# Altium PCB PCI Express Mini L1.PCBDOC (part 5 of 7)
Units mm, origin at the board's own origin, x right, y up, seen from the top; angles counter-clockwise.
Board outline 70 x 83.2 mm, 6 copper layers (TopLayer, Layer 1, Layer 2, Layer 3, Layer 4, Bottom Layer), stack 0.914 mm thick; 402 components, 242 nets, 1301 pads, 522 vias.
Unrouted connection lines stored in the file: 225.
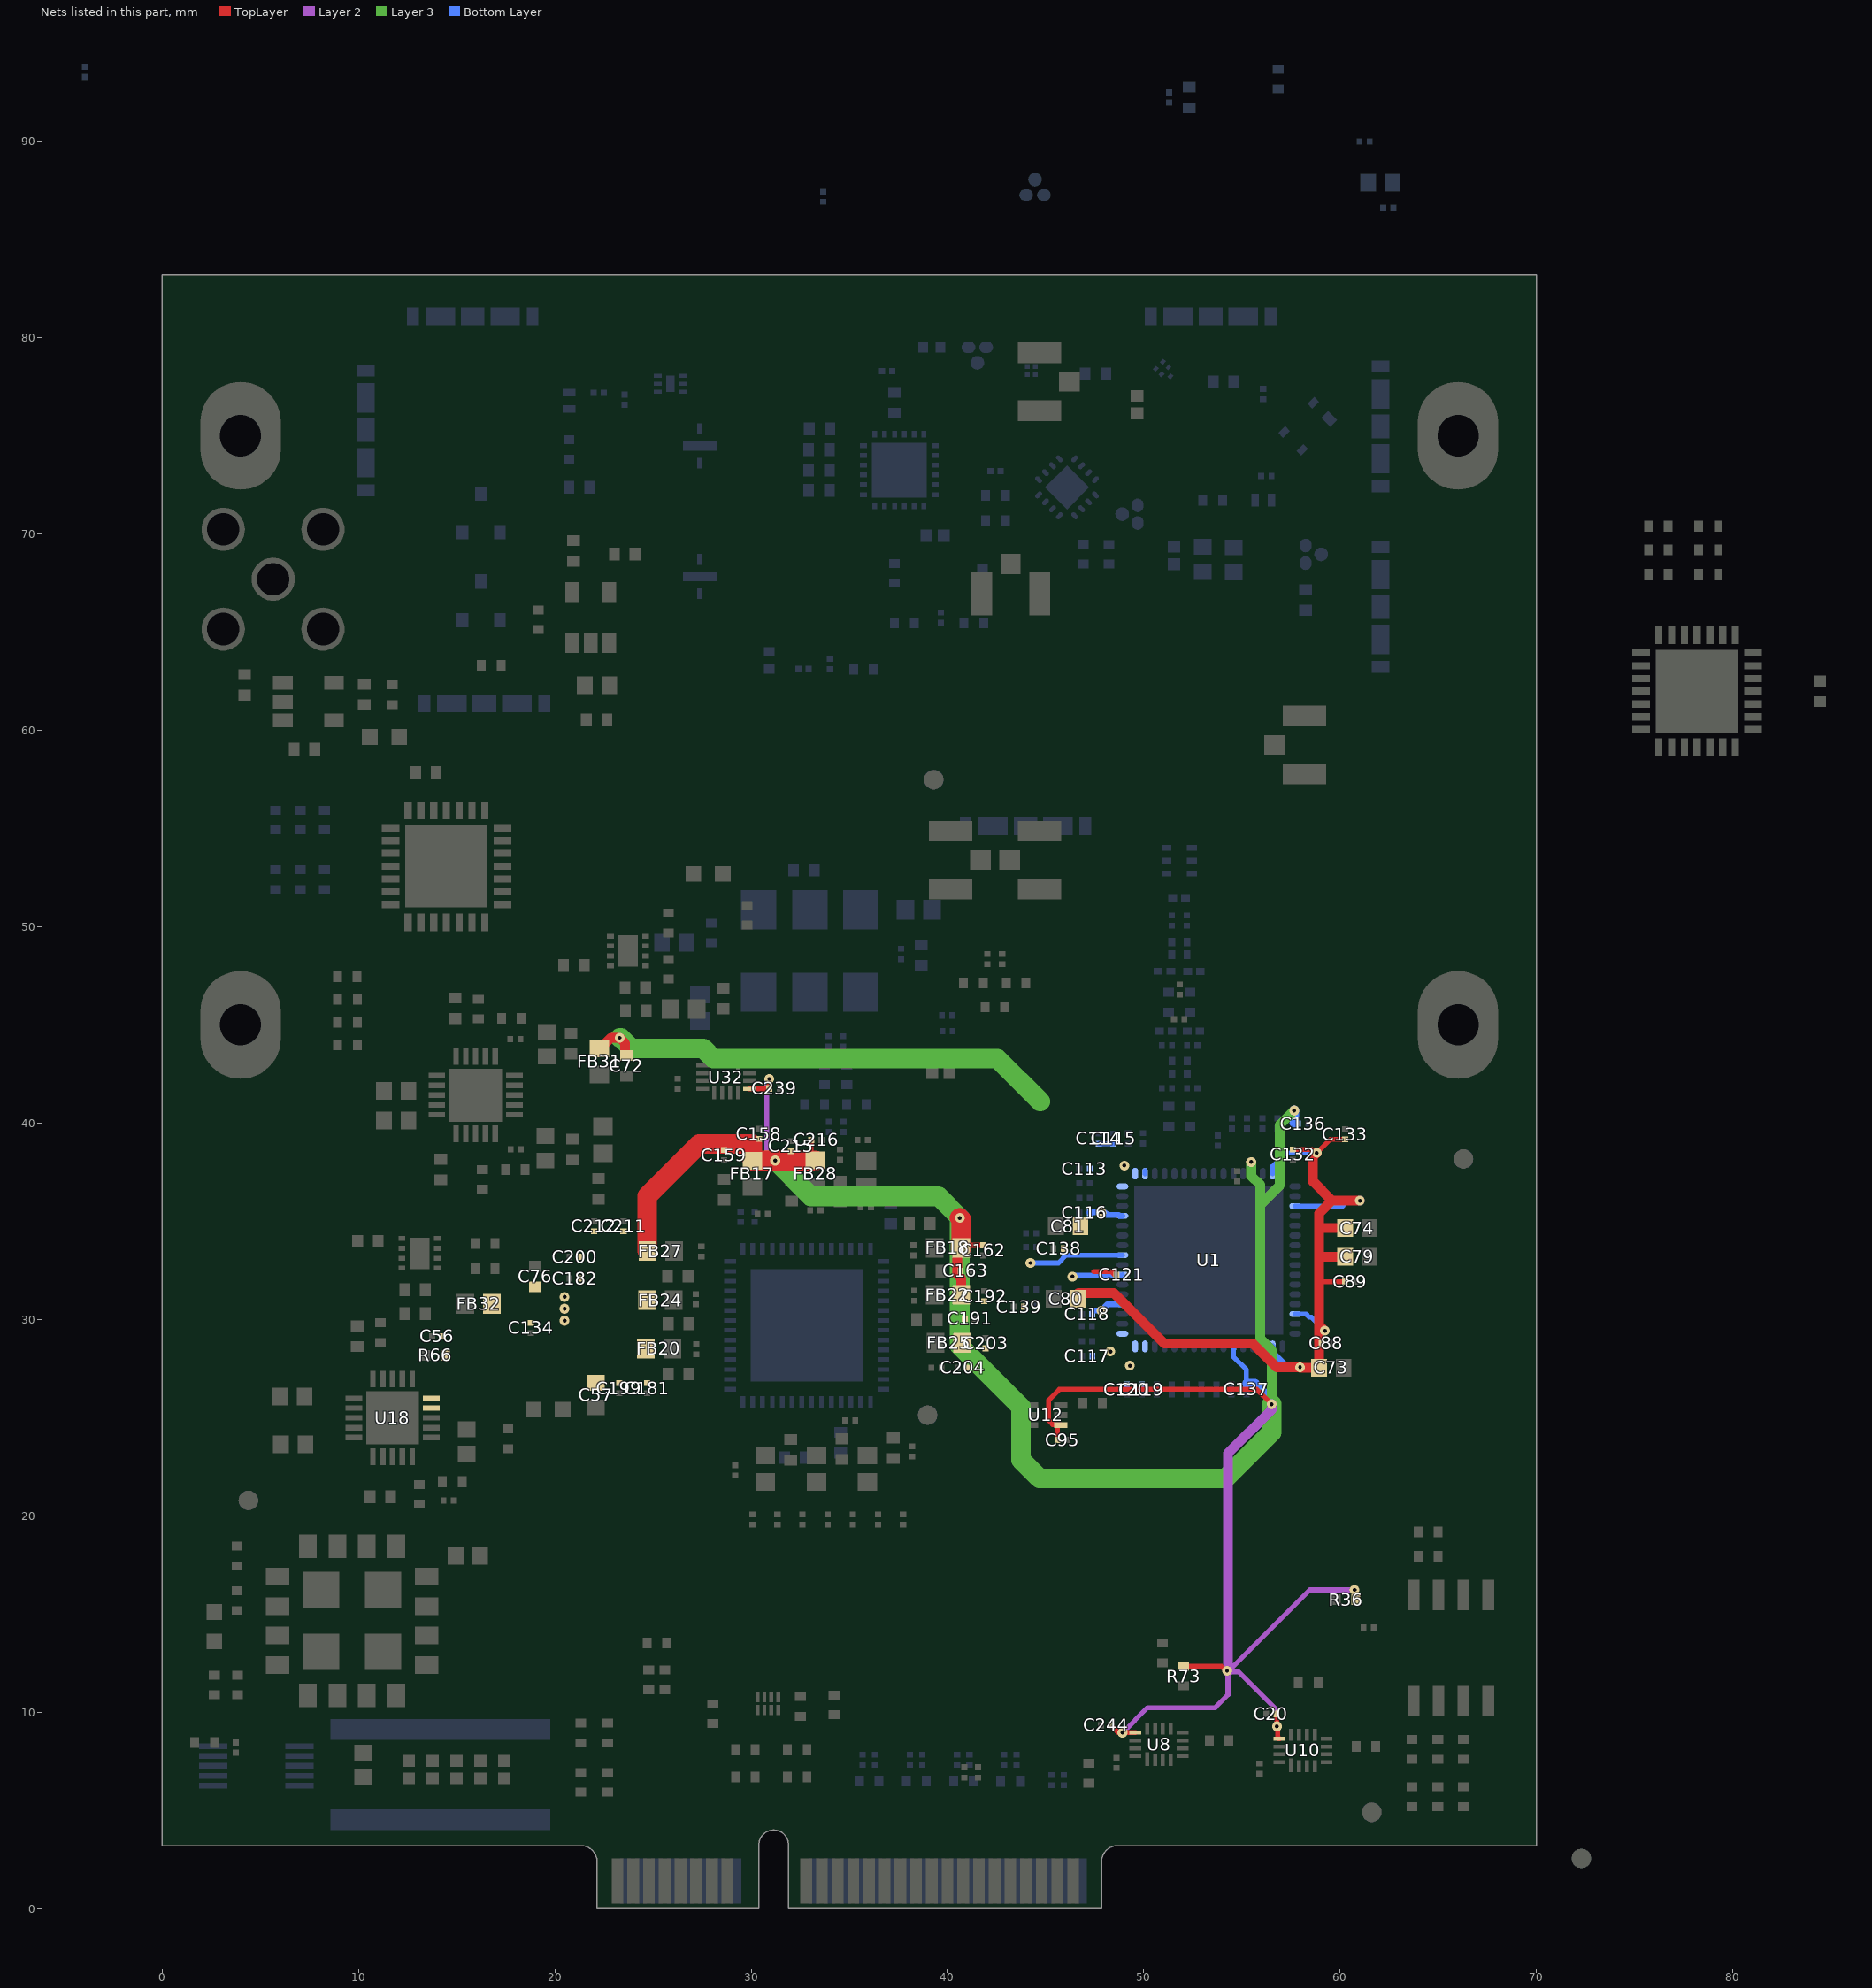
[diagram p6: the nets of this part, all layers, seen from the top]

## Part data (continued)
U3: "IC MONITOR PWR/CURR BIDIR 10MSOP", Case/Package=VSSOP, Input Bias Current=10uA, Input Offset Voltage (Vos)=2.5uV, Manufacturer="Texas Instruments", Max Operating Temperature=125°C, Max Supply Voltage=5.5V, Min Operating Temperature=-40°C, Min Supply Voltage=2.7V, Nominal Supply Current=330uA, Output Current=10mA, Package Quantity=1, Supplier Part Number 1=296-29034-1-ND, Accuracy=0.02%, Common Mode Rejection Ratio=140dB, ComponentLink1Description=https://datasheet.ciiva.com/1939/ina226-1939633.pdf?src-supplier=Digi-Key, ComponentLink1URL=https://datasheet.ciiva.com/1939/ina226-1939633.pdf?src-supplier=Digi-Key, ComponentLink2Description=https://datasheet.ciiva.com/4875/sbos547-126280-4875559.pdf?src-supplier=Mouser, ComponentLink2URL=https://datasheet.ciiva.com/4875/sbos547-126280-4875559.pdf?src-supplier=Mouser, ComponentLink3Description=https://datasheet.ciiva.com/1939/ina226-1939634.pdf?src-supplier=Digi-Key, ComponentLink3URL=https://datasheet.ciiva.com/1939/ina226-1939634.pdf?src-supplier=Digi-Key, ComponentLink4Description=https://datasheet.ciiva.com/1939/ina226-1939635.pdf?src-supplier=Digi-Key, ComponentLink4URL=https://datasheet.ciiva.com/1939/ina226-1939635.pdf?src-supplier=Digi-Key, ComponentLink5Description=https://datasheet.ciiva.com/14196/ina226-14196741.pdf?src-supplier=Avnet, ComponentLink5URL=https://datasheet.ciiva.com/14196/ina226-14196741.pdf?src-supplier=Avnet, ComponentLink6Description=https://datasheet.ciiva.com/22693/1840205-22693516.pdf?src-supplier=Element14, ComponentLink6URL=https://datasheet.ciiva.com/22693/1840205-22693516.pdf?src-supplier=Element14, Contact Plating=Gold, Lead Free="Lead Free", Manufacturer Part Number=INA226AIDGSR, Mount="Surface Mount", Number of Pins=10, Packaging="Tape and Reel", Pricing 1="1 = 2,88000, 10 = 2,58900, 100 = 2,12100, 500 = 1,80554, 1000 = 1,52275 (USD)", Radiation Hardening=No, REACH SVHC="No SVHC", RoHS=Yes, Stock 1=62024, Supplier 1=Digi-Key
U4 U33: "IC I/O EXPANDER I2C 16B 28QFN", Case/Package=QFN, Frequency=1.7MHz, Manufacturer=Microchip, Max Operating Temperature=125°C, Min Operating Temperature=-40°C, Operating Supply Voltage=5.5V, Output Current=25mA, Package Quantity=1600, Power Dissipation=700mW, Supplier Part Number 1=MCP23017T-E/MLCT-ND, ComponentLink1Description=https://datasheet.ciiva.com/1780/21952b-1780757.pdf?src-supplier=Digi-Key, ComponentLink1URL=https://datasheet.ciiva.com/1780/21952b-1780757.pdf?src-supplier=Digi-Key, ComponentLink2Description=https://datasheet.ciiva.com/16454/filehandler-aspxddocname-en023709-16454263.pdf?src-supplier=Future+Electronics, ComponentLink2URL=https://datasheet.ciiva.com/16454/filehandler-aspxddocname-en023709-16454263.pdf?src-supplier=Future+Electronics, ComponentLink3Description=https://datasheet.ciiva.com/8128/21952b-8128584.pdf?src-supplier=Avnet, ComponentLink3URL=https://datasheet.ciiva.com/8128/21952b-8128584.pdf?src-supplier=Avnet, Contact Plating=Tin,Matte, Interface=I2C,Serial, Lead Free="Lead Free", Manufacturer Part Number=MCP23017T-E/ML, Max Frequency=1.7MHz, Number of Bits=16, Number of I/Os=16, Packaging="Tape and Reel", Pricing 1="1 = 1,45000, 25 = 1,21560, 100 = 1,10210 (USD)", RoHS=Yes, Stock 1=7016, Supplier 1=Digi-Key
U5 U20: "IC REG LINEAR 5V 300MA SOT23-5", Case/Package=SOT-23-5, Dropout Voltage=250mV, Manufacturer=Diodes, Max Input Voltage=13.2V, Max Operating Temperature=125°C, Max Output Current=300mA, Min Input Voltage=2.5V, Min Operating Temperature=-40°C, Output Voltage=5V, Package Quantity=3000, Power Supply Rejection Ratio (PSRR)=75dB, Quiescent Current=150uA, Supplier Part Number 1=AP2210K-5.0TRG1DICT-ND, Accuracy=1%, Category="Voltage Regulators - Linear", ComponentLink1Description=https://datasheet.ciiva.com/29569/ap2210-29569974.pdf?src-supplier=Digi-Key, ComponentLink1URL=https://datasheet.ciiva.com/29569/ap2210-29569974.pdf?src-supplier=Digi-Key, ComponentLink2Description=https://datasheet.ciiva.com/29569/ap2210-29569975.pdf?src-supplier=Digi-Key, ComponentLink2URL=https://datasheet.ciiva.com/29569/ap2210-29569975.pdf?src-supplier=Digi-Key, ComponentLink3Description=https://datasheet.ciiva.com/29569/ap2210-29569976.pdf?src-supplier=Digi-Key, ComponentLink3URL=https://datasheet.ciiva.com/29569/ap2210-29569976.pdf?src-supplier=Digi-Key, Lead Free="Lead Free", Manufacturer Part Number=AP2210K-5.0TRG1, Mount="Surface Mount", Number of Outputs=1, Number of Pins=5, Number of Regulators=1, Output Current=300mA, Output Type=Fixed, Packaging="Tape and Reel", Polarity=Positive, Pricing 1="1=0,42000, 10=0,34200, 25=0,31280, 100=0,21090, 250=0,17452, 500=0,15998, 1000=0,11999 (USD)", RoHS=Yes, Stock 1=36767, Supplier 1=Digi-Key, Weight=0.001058oz
U6: "Microchip 24LC32AT-I/SN Serial EEPROM Memory, 32kbit, 1000ns, 2.5  5.5 V 8-Pin SOIC", Case/Package=SOIC, Frequency=400kHz, Manufacturer=Microchip, Max Operating Temperature=85°C, Max Supply Voltage=5.5V, Min Operating Temperature=-40°C, Min Supply Voltage=2.5V, Nominal Supply Current=3mA, Package Quantity=3300, Supplier Part Number 1=24LC32AT-I/SNCT-ND, Access Time=900ns, Category=EEPROM, ComponentLink1Description=https://datasheet.ciiva.com/1165/1669362-1165104.pdf?src-supplier=Newark, ComponentLink1URL=https://datasheet.ciiva.com/1165/1669362-1165104.pdf?src-supplier=Newark, ComponentLink2Description=https://datasheet.ciiva.com/15123/getdatasheetpartid-768552-15123863.pdf?src-supplier=Verical, ComponentLink2URL=https://datasheet.ciiva.com/15123/getdatasheetpartid-768552-15123863.pdf?src-supplier=Verical, ComponentLink3Description=https://datasheet.ciiva.com/14134/24aa32a-24lc32a-eng-tds-14134838.pdf?src-supplier=Distrelec, ComponentLink3URL=https://datasheet.ciiva.com/14134/24aa32a-24lc32a-eng-tds-14134838.pdf?src-supplier=Distrelec, ComponentLink4Description=https://datasheet.ciiva.com/8059/1669362-8059144.pdf?src-supplier=Element14, ComponentLink4URL=https://datasheet.ciiva.com/8059/1669362-8059144.pdf?src-supplier=Element14, ComponentLink5Description=https://datasheet.ciiva.com/3184/21713l-3184953.pdf?src-supplier=Avnet, ComponentLink5URL=https://datasheet.ciiva.com/3184/21713l-3184953.pdf?src-supplier=Avnet, ComponentLink6Description=https://datasheet.ciiva.com/17651/21713l-17651374.pdf?src-supplier=Avnet+Europe, ComponentLink6URL=https://datasheet.ciiva.com/17651/21713l-17651374.pdf?src-supplier=Avnet+Europe, Contact Plating=Tin,Matte, Density=32Kb, Height=1.5mm, Interface=I2C,Serial,2-Wire, Lead Free="Lead Free", Length=4.9mm, Manufacturer Part Number=24LC32AT-I/SN, Max Frequency=400kHz, Memory Size=32Kb, Memory Type=EEPROM, Mount="Surface Mount", Number of Pins=8, Number of Words=4, Packaging="Tape and Reel", Pricing 1="1=0,34000, 25=0,33000, 100=0,31000 (USD)", Radiation Hardening=No, REACH SVHC="No SVHC", RoHS=Yes, Stock 1=9460, Supplier 1=Digi-Key, Width=3.9mm
U7 U18: "IC REG LINEAR POS ADJ 1A 20QFN", Case/Package=QFN, Dropout Voltage=130mV, Manufacturer="Texas Instruments", Max Operating Temperature=125°C, Min Current Limit=1.5A, Min Operating Temperature=-40°C, Output Current=1A, Output Voltage=5V, Quiescent Current=2mA, Supplier Part Number 1=296-43312-1-ND, Category="Voltage References", ComponentLink1Description=http://www.ti.com/lit/gpn/tps7a88?src-supplier=Mouser, ComponentLink1URL=http://www.ti.com/lit/gpn/tps7a88?src-supplier=Mouser, ComponentLink2Description=http://www.ti.com/lit/ds/symlink/tps7a88.pdf?src-supplier=Digi-Key, ComponentLink2URL=http://www.ti.com/lit/ds/symlink/tps7a88.pdf?src-supplier=Digi-Key, ComponentLink3Description=http://www.ti.com/general/docs/lit/getliterature.tsp?genericPartNumber=TPS7A88&amp;&amp;fileType=pdf&src-supplier=Farnell, ComponentLink3URL=http://www.ti.com/general/docs/lit/getliterature.tsp?genericPartNumber=TPS7A88&amp;&amp;fileType=pdf&src-supplier=Farnell, Lead Free="Lead Free", Manufacturer Part Number=TPS7A8801RTJT, Mount="Surface Mount", Number of Outputs=2, Number of Pins=20, Number of Regulators=2, Packaging="Tape and Reel", Pricing 1="1=2,77000, 10=2,48700, 25=2,34600, 100=1,87670 (USD)", RoHS=Yes, Stock 1=1455, Supplier 1=Digi-Key
U8 U10: "4-bit dual-supply bus transceiver with 3-state outputs and independent direction control inputs 16-UQFN -40 to 125", Manufacturer="Texas Instruments", Supplier Part Number 1=296-SN74AXC4T774RSVRCT-ND, Category="Buffers, Drivers and Transceivers", Manufacturer Part Number=SN74AXC4T774RSVR, Pricing 1="1=1,21000, 10=1,08600, 25=1,03040, 100=0,84640, 250=0,79120, 500=0,69920, 1000=0,55200 (USD)", RoHS=No, Stock 1=2179, Supplier 1=Digi-Key
U9: Manufacturer="Texas Instruments", Max Operating Temperature=85°C, Min Operating Temperature=-40°C, Supplier Part Number 1=296-51339-1-ND, Manufacturer Part Number=LMK04610RTQR, Number of Inputs=2, Number of Outputs=10, Pricing 1="1 = 20,47000, 10 = 18,87700, 100 = 16,11940, 500 = 14,63474 (USD)", RoHS=No, Stock 1=2022, Supplier 1=Digi-Key
U11: "BALUN WIMAX1600MHZ", Case Code (Imperial)=0805, Case Code (Metric)=2012, Frequency=1.6GHz, Manufacturer=Johanson, Manufacturer Part Number=1720BL15A0100_WM, Max Operating Temperature=85°C, Min Operating Temperature=-40°C, Package Quantity=4000, Case/Package=0805, Category=Uncategorized, ComponentLink1Description=https://datasheet.ciiva.com/24023/balun-1600bl15b100-v2-242372-24023192.pdf?src-supplier=Mouser, ComponentLink1URL=https://datasheet.ciiva.com/24023/balun-1600bl15b100-v2-242372-24023192.pdf?src-supplier=Mouser, ComponentLink2Description=https://datasheet.ciiva.com/3859/balun-1600bl15b100-v2-3859272.pdf?src-supplier=Arrow+Electronics, ComponentLink2URL=https://datasheet.ciiva.com/3859/balun-1600bl15b100-v2-3859272.pdf?src-supplier=Arrow+Electronics, ComponentLink3Description=https://datasheet.ciiva.com/2788/1600bl15b100-2788754.pdf?src-supplier=Digi-Key, ComponentLink3URL=https://datasheet.ciiva.com/2788/1600bl15b100-2788754.pdf?src-supplier=Digi-Key, ComponentLink4Description=https://datasheet.ciiva.com/2788/1600bl15b100-2788755.pdf?src-supplier=Digi-Key, ComponentLink4URL=https://datasheet.ciiva.com/2788/1600bl15b100-2788755.pdf?src-supplier=Digi-Key, ComponentLink5Description=https://datasheet.ciiva.com/2788/1600bl15b100-2788756.pdf?src-supplier=Digi-Key, ComponentLink5URL=https://datasheet.ciiva.com/2788/1600bl15b100-2788756.pdf?src-supplier=Digi-Key, Composition=Ceramic, Impedance=100R, Insertion Loss=1dB, Mount="Surface Mount", Packaging="Tape and Reel", Pricing 1="1=0,83000, 10=0,80900, 25=0,54120, 50=0,48180, 100=0,44140, 250=0,39600, 500=0,38776, 1000=0,28050 (USD)", Radiation Hardening=No, RoHS=Yes, Stock 1=406, Termination=SMD/SMT
U12: "TXB0101 (LVC1T55) DRLT Setup", Case/Package=SOT-553-6, High Level Output Current=-20uA, Low Level Output Current=20uA, Manufacturer="Texas Instruments", Max Operating Temperature=85°C, Max Supply Voltage=5.5V, Min Operating Temperature=-40°C, Min Supply Voltage=1.65V, Package Quantity=1, Supplier Part Number 1=296-32600-1-ND, Category="Integrated Circuits (ICs)", ComponentLink1Description=https://datasheet.ciiva.com/15096/getdatasheetpartid-539440-15096428.pdf?src-supplier=Verical, ComponentLink1URL=https://datasheet.ciiva.com/15096/getdatasheetpartid-539440-15096428.pdf?src-supplier=Verical, ComponentLink2Description=https://datasheet.ciiva.com/6615/txb0101-6615081.pdf?src-supplier=Digi-Key, ComponentLink2URL=https://datasheet.ciiva.com/6615/txb0101-6615081.pdf?src-supplier=Digi-Key, ComponentLink3Description=https://datasheet.ciiva.com/6615/txb0101-6615083.pdf?src-supplier=Digi-Key, ComponentLink3URL=https://datasheet.ciiva.com/6615/txb0101-6615083.pdf?src-supplier=Digi-Key, ComponentLink4Description=https://datasheet.ciiva.com/6615/txb0101-6615084.pdf?src-supplier=Digi-Key, ComponentLink4URL=https://datasheet.ciiva.com/6615/txb0101-6615084.pdf?src-supplier=Digi-Key, Contact Plating=Gold, Data Rate=100Mbps, Height=0.55mm, Lead Free="Lead Free", Length=1.7mm, Logic Function=Translator, Manufacturer Part Number=TXB0101DRLT, Mount="Surface Mount", Number of Bits=1, Number of Channels=1, Number of Pins=6, Packaging="Tape and Reel", Pricing 1="1=0,56000, 10=0,49500, 25=0,46520, 100=0,37950 (USD)", Propagation Delay=4ns, Radiation Hardening=No, RoHS=Yes, Stock 1=1962, Supplier 1=Digi-Key, Turn-On Delay Time=31ns, Weight=9.9E-05oz, Width=1.3mm
U13: Operating Frequency="1550 - 1615 MHz", Supplier Part Number 1=BGA524N6E6327XTSA1DKR-ND, Gain="16,6 dBm", Part Number=BGA524N6, Supplier 1=Digi-Key, URL=https://www.infineon.com/dgdl/Infineon-BGA524N6-DS-v03_00-en.pdf?fileId=db3a304344e406b50144e44dfad302b9
U14: Frequency="DC - 3.5GHz", Supplier Part Number 1=BGA616H6327XTSA1CT-ND, Supplier 1=Digi-Key
U15: "RF Detector 0MHz to 6000MHz 16-Pin LFCSP EP T/R", Manufacturer="Analog Devices", Operating Supply Current=4mA, Supplier Part Number 1=ADL5910ACPZN-R7CT-ND, Category="RF Semiconductors and Devices", ComponentLink1Description=https://www.analog.com/media/en/technical-documentation/data-sheets/ADL5910.pdf?src-supplier=Digi-Key, ComponentLink1URL=https://www.analog.com/media/en/technical-documentation/data-sheets/ADL5910.pdf?src-supplier=Digi-Key, Manufacturer Part Number=ADL5910ACPZN-R7, Number of Pins=16, Packaging="Cut Tape", Pricing 1="1=5,17000, 10=4,64100, 25=4,38760, 100=3,80250, 250=3,60752, 500=3,23700 (USD)", RoHS=No, Stock 1=1503, Supplier 1=Digi-Key
U16: "TEXAS INSTRUMENTS   PCA9306DQER.   IC, SMBus, 5V, X2SON-8", Low Level Output Current=128mA, Manufacturer 1="Texas Instruments", Max Operating Temperature=85°C, Max Supply Voltage=5V, Min Operating Temperature=-40°C, Min Supply Voltage=0uV, Package Quantity=1, Supplier Part Number 1=296-27957-1-ND, ComponentLink1Description=https://datasheet.ciiva.com/22631/1719693-22631024.pdf?src-supplier=Element14, ComponentLink1URL=https://datasheet.ciiva.com/22631/1719693-22631024.pdf?src-supplier=Element14, ComponentLink2Description=https://datasheet.ciiva.com/1899/pca9306-1899328.pdf?src-supplier=Digi-Key, ComponentLink2URL=https://datasheet.ciiva.com/1899/pca9306-1899328.pdf?src-supplier=Digi-Key, ComponentLink3Description=https://datasheet.ciiva.com/15095/getdatasheetpartid-306496-15095555.pdf?src-supplier=Verical, ComponentLink3URL=https://datasheet.ciiva.com/15095/getdatasheetpartid-306496-15095555.pdf?src-supplier=Verical, ComponentLink4Description=https://datasheet.ciiva.com/1504/1862428-1504149.pdf?src-supplier=Element14, ComponentLink4URL=https://datasheet.ciiva.com/1504/1862428-1504149.pdf?src-supplier=Element14, ComponentLink5Description=https://datasheet.ciiva.com/1899/pca9306-1899326.pdf?src-supplier=Digi-Key, ComponentLink5URL=https://datasheet.ciiva.com/1899/pca9306-1899326.pdf?src-supplier=Digi-Key, ComponentLink6Description=https://datasheet.ciiva.com/14287/pca9306-14287374.pdf?src-supplier=Avnet, ComponentLink6URL=https://datasheet.ciiva.com/14287/pca9306-14287374.pdf?src-supplier=Avnet, ComponentLink7Description=https://datasheet.ciiva.com/14287/pca9306-14287470.pdf?src-supplier=Avnet, ComponentLink7URL=https://datasheet.ciiva.com/14287/pca9306-14287470.pdf?src-supplier=Avnet, ComponentLink8Description=https://datasheet.ciiva.com/1899/pca9306-1899327.pdf?src-supplier=Digi-Key, ComponentLink8URL=https://datasheet.ciiva.com/1899/pca9306-1899327.pdf?src-supplier=Digi-Key, ComponentLink9Description=https://datasheet.ciiva.com/26041/pca9306-26041014.pdf?src-supplier=Avnet+Europe, ComponentLink9URL=https://datasheet.ciiva.com/26041/pca9306-26041014.pdf?src-supplier=Avnet+Europe, Height=0.35mm, Lead Free="Lead Free", Length=1.45mm, Logic Function=Translator, Manufacturer Part Number 1=PCA9306DQER, Number of Bits=2, Number of Channels=2, Number of Outputs=2, Number of Pins=8, Output Type=I2C, Packaging="Tape and Reel", Pricing 1="1=0,67000, 10=0,59100, 100=0,45340, 500=0,35844, 1000=0,28675 (USD)", Propagation Delay=0.3ns, Radiation Hardening=No, REACH SVHC="No SVHC", RoHS=Yes, Stock 1=25002, Supplier 1=Digi-Key, Turn-On Delay Time=1.4ns, Width=1.05mm
U17: library part 171031801, "MagI3C-VDRM Variable Step Down Regulator Module, LGA-16EP, 4-18Vin, 3Aout", Input Voltage=4-18V, Manufacturer="Wurth Elektronik", Operating Temperature="-40 to +125degC", Output Current=3A, Output Voltage=0.8-17V, ComponentLink1Description=Manufacturer, ComponentLink1URL=http://www.we-online.de, ComponentLink2Description=Datasheet, ComponentLink2URL=https://katalog.we-online.de/pm/datasheet/171031801.pdf, Manufacturer Part Number=171031801, Mounting Technology=SMT, Packaging="Tape and Reel", Published Date="April 2020", Size=LGA-16EP
U19 U21: "IC REG LIN POS ADJ 500MA 8LFCSP", Case/Package=MSOP, Dropout Voltage=130mV, Manufacturer="Analog Devices", Max Input Voltage=5.5V, Max Operating Temperature=125°C, Max Output Current=500mA, Max Output Voltage=5V, Max Supply Current=210uA, Min Current Limit=550mA, Min Input Voltage=2.3V, Min Operating Temperature=-40°C, Min Output Voltage=800mV, Nominal Supply Current=45uA, Power Supply Rejection Ratio (PSRR)=60dB, Reference Voltage=500mV, Supplier Part Number 1=2457144, Accuracy=1%, ComponentLink1Description=https://datasheet.ciiva.com/17365/adp124-125-17365589.pdf?src-supplier=Avnet+Europe, ComponentLink1URL=https://datasheet.ciiva.com/17365/adp124-125-17365589.pdf?src-supplier=Avnet+Europe, ComponentLink2Description=https://datasheet.ciiva.com/2056/adp124-125-2056955.pdf?src-supplier=Digi-Key, ComponentLink2URL=https://datasheet.ciiva.com/2056/adp124-125-2056955.pdf?src-supplier=Digi-Key, ComponentLink3Description=https://datasheet.ciiva.com/2056/adp124-125-2056954.pdf?src-supplier=Digi-Key, ComponentLink3URL=https://datasheet.ciiva.com/2056/adp124-125-2056954.pdf?src-supplier=Digi-Key, ComponentLink4Description=https://datasheet.ciiva.com/2056/adp124-125-2056956.pdf?src-supplier=Digi-Key, ComponentLink4URL=https://datasheet.ciiva.com/2056/adp124-125-2056956.pdf?src-supplier=Digi-Key, ComponentLink5Description=https://datasheet.ciiva.com/48694/001251247-da-01-en-ic-reg-l-adj-adp125acpz-r7-lfcspud-8-adi-48694599.pdf?src-supplier=Conrad, ComponentLink5URL=https://datasheet.ciiva.com/48694/001251247-da-01-en-ic-reg-l-adj-adp125acpz-r7-lfcspud-8-adi-48694599.pdf?src-supplier=Conrad, ComponentLink6Description=http://datasheet.octopart.com/ADP125ACPZ-R7-Analog-Devices-datasheet-11525030.pdf?src-supplier=Newark, ComponentLink6URL=http://datasheet.octopart.com/ADP125ACPZ-R7-Analog-Devices-datasheet-11525030.pdf?src-supplier=Newark, ComponentLink7Description=http://datasheet.octopart.com/ADP125ACPZ-R7-Analog-Devices-datasheet-38878834.pdf?src-supplier=Newark, ComponentLink7URL=http://datasheet.octopart.com/ADP125ACPZ-R7-Analog-Devices-datasheet-38878834.pdf?src-supplier=Newark, ComponentLink8Description=http://datasheet.octopart.com/ADP125ACPZ-R7-Analog-Devices-datasheet-10623001.pdf?src-supplier=Analog+Devices, ComponentLink8URL=http://datasheet.octopart.com/ADP125ACPZ-R7-Analog-Devices-datasheet-10623001.pdf?src-supplier=Analog+Devices, ComponentLink9Description=http://datasheet.octopart.com/ADP125ACPZ-R7-Analog-Devices-datasheet-8638579.pdf?src-supplier=Analog+Devices, ComponentLink9URL=http://datasheet.octopart.com/ADP125ACPZ-R7-Analog-Devices-datasheet-8638579.pdf?src-supplier=Analog+Devices, ComponentLink10Description=http://datasheet.octopart.com/ADP125ACPZ-R7-Analog-Devices-datasheet-11776558.pdf?src-supplier=Arrow, ComponentLink10URL=http://datasheet.octopart.com/ADP125ACPZ-R7-Analog-Devices-datasheet-11776558.pdf?src-supplier=Arrow, Contact Plating=Gold, Height=0.6mm, Lead Free="Contains Lead", Length=2mm, Manufacturer 2="Analog Devices", Manufacturer Part Number=ADP125ACPZ-R7, Manufacturer Part Number 2=ADP125ACPZ-R7, Number of Outputs=1, Number of Pins=8, Number of Regulators=1, Operating Supply Current=45uA, Output Current=500mA, Output Type=Adjustable, Output Voltage=5V, Packaging="Tape and Reel", Polarity=Positive, Pricing 2="1=1.39000, 10=1.23900, 25=1.17600, 100=0.96600, 250=0.90300, 500=0.79800, 1000=0.63000 (USD)", Quiescent Current=45uA, REACH SVHC="No SVHC", RoHS=Yes, Stock 1=261, Stock 2=12322, Supplier 1=Farnell, Supplier 2=Digi-Key, Supplier Part Number 2=ADP125ACPZ-R7CT-ND, Width=2mm
U32: "IC TRNSLTR BIDIRECTIONAL 16UQFN", High Level Output Current=-20uA, Low Level Output Current=20uA, Manufacturer 1="Texas Instruments", Max Operating Temperature=85°C, Max Supply Voltage=3.6V, Min Operating Temperature=-40°C, Min Supply Voltage=900mV, Nominal Supply Current=5uA, Package Quantity=1, Quiescent Current=10uA, Supplier Part Number 1=296-29681-1-ND, ComponentLink1Description=https://datasheet.ciiva.com/1900/txb0304-1900817.pdf?src-supplier=Digi-Key, ComponentLink1URL=https://datasheet.ciiva.com/1900/txb0304-1900817.pdf?src-supplier=Digi-Key, ComponentLink2Description=https://datasheet.ciiva.com/15096/getdatasheetpartid-490462-15096317.pdf?src-supplier=Verical, ComponentLink2URL=https://datasheet.ciiva.com/15096/getdatasheetpartid-490462-15096317.pdf?src-supplier=Verical, ComponentLink3Description=https://datasheet.ciiva.com/1900/txb0304-1900818.pdf?src-supplier=Digi-Key, ComponentLink3URL=https://datasheet.ciiva.com/1900/txb0304-1900818.pdf?src-supplier=Digi-Key, ComponentLink4Description=https://datasheet.ciiva.com/1900/txb0304-1900819.pdf?src-supplier=Digi-Key, ComponentLink4URL=https://datasheet.ciiva.com/1900/txb0304-1900819.pdf?src-supplier=Digi-Key, ComponentLink5Description=https://datasheet.ciiva.com/14287/txb0304-14287243.pdf?src-supplier=Avnet, ComponentLink5URL=https://datasheet.ciiva.com/14287/txb0304-14287243.pdf?src-supplier=Avnet, Contact Plating=Gold, Data Rate=140Mbps, Lead Free="Lead Free", Logic Function=Translator, Manufacturer Part Number 1=TXB0304RSVR, Mount="Surface Mount", Number of Bits=4, Number of Channels=4, Number of Inputs=4, Number of Outputs=4, Number of Pins=16, Packaging="Tape and Reel", Pricing 1="1=1.45000, 10=1.29700, 100=1.01160, 500=0.83564, 1000=0.65972 (USD)", Propagation Delay=4.8ns, Radiation Hardening=No, REACH SVHC="No SVHC", RoHS=Yes, Stock 1=1758, Supplier 1=Digi-Key, Turn-On Delay Time=18.9ns
X1: "OSC VCXO 122.88MHZ LVPECL SMD", Case/Package=SMD/SMT, Frequency=122.88MHz, Manufacturer=Epson, Max Operating Temperature=85°C, Max Supply Current=65mA, Min Operating Temperature=-40°C, Supplier Part Number 1=SER3907CT-ND, ComponentLink1Description=https://datasheet.ciiva.com/29626/vg-4513ca-partnumber-29626986.pdf?src-supplier=Digi-Key, ComponentLink1URL=https://datasheet.ciiva.com/29626/vg-4513ca-partnumber-29626986.pdf?src-supplier=Digi-Key, ComponentLink2Description=https://datasheet.ciiva.com/29626/vg-4513ca-partnumber-29626987.pdf?src-supplier=Digi-Key, ComponentLink2URL=https://datasheet.ciiva.com/29626/vg-4513ca-partnumber-29626987.pdf?src-supplier=Digi-Key, ComponentLink3Description=https://datasheet.ciiva.com/29626/076-vg-4513ca-cb-e13ya-29626988.pdf?src-supplier=Digi-Key, ComponentLink3URL=https://datasheet.ciiva.com/29626/076-vg-4513ca-cb-e13ya-29626988.pdf?src-supplier=Digi-Key, Height=0.071inch, Lead Free="Lead Free", Length=0.276inch, Manufacturer Part Number=VG-4513CA122.8800M-GFCT3, Mount="Surface Mount", Packaging="Tape and Reel", Pricing 1="1 = 9,91000, 10 = 9,29000, 50 = 8,97980, 100 = 8,67020 (USD)", RoHS=Yes, Stock 1=438, Supplier 1=Digi-Key, Width=0.197inch

## Free pads (board coordinates)
  oval 4.1x5.5 hole 2.1 slot 4 at 90 deg unplated: ""(4,45) ""(4,75) ""(66,45) ""(66,75)

## Via types
v1: diameter 0.5, hole 0.2, TopLayer to Bottom Layer, tented both sides, 311 vias
v2: diameter 0.5, hole 0.2, TopLayer to Bottom Layer, 211 vias

## Nets (pads, with @x,y where several pads share a name; then routed paths per layer and width w, separated by ;. In a path a pad name is that pad's centre, name@x,y a point inside that pad or via, vN(x,y) a via of type N, cw(c..) or ccw(c..) an arc to the next point about the centre after c; other vN are vias at no path point)
1V8@1A: C20.1 C56.2 C57.2 C95.1 C136.2 C137.2 C158.2 C159.2 C162.2 C163.2 C181.2 C182.2 C191.2 C192.2 C199.2 C200.2 C203.2 C204.2 C211.2 C212.2 C215.2 C216.2 C239.1 C244.1 FB17.1 FB18.1 FB20.1 FB22.1 FB24.1 FB25.1 FB27.1 FB28.1 R36.1 R66.2 R73.2 U1.13 U1.38 U8.13 U10.13 U12.1 U18.14 U18.15 U32.13 | length 144.1
  TopLayer w0.25: U32.13@29.924,41.736 30.901,41.736 C239.1@30.926,41.763 C239.1@30.926,41.763 30.901,41.788 30.901,42.225 v1(30.923,42.247) ; FB17.1@30.094,38.506 30.395,38.807 C158.2@30.395,39.191 ; C216.2@33.061,39.141 33.061,38.315 FB28.1@33.279,38.098 ; FB18.1@40.695,33.647 40.824,33.777 C162.2@41.82,33.777 ; C95.1@45.604,23.857 45.604,24.602 U12.1@45.654,24.652 ; U12.1@45.76,24.627 45.735,24.652 U12.1@45.654,24.652 ; C244.1@48.335,9.342 48.335,9.332 48.709,8.958 v1(48.912,8.958) U8.13@49.57,8.958 ; R73.2@52.033,12.332 53.954,12.332 54.179,12.107 v1(54.239,12.107) ; v1(56.508,25.685) 56.508,25.688 55.76,26.436 45.696,26.436 45.15,25.891 45.15,24.863 45.361,24.652 U12.1@45.654,24.652 ; C20.1@56.75,9.911 56.764,9.897 56.764,9.291 v1(56.778,9.278) 56.826,9.23 56.826,8.678 56.851,8.653 U10.13@56.903,8.653 ; v1(60.731,16.228) 60.767,16.192 60.767,15.764 R36.1@60.804,15.728
  TopLayer w0.5: FB22.1@40.695,31.248 40.695,32.088 40.495,32.288 40.495,33.447 FB18.1@40.695,33.647
  TopLayer w1: FB27.1@24.723,33.48 24.701,33.502 24.701,36.279 27.359,38.937 30.035,38.937 30.061,38.911 FB17.1@30.061,38.09 v1(31.227,38.09) 33.271,38.09 FB28.1@33.279,38.098 ; v1(40.624,35.169) 40.695,35.098 FB18.1@40.695,33.647
  Layer 2 w0.25: v1(30.923,42.247) 30.802,42.125 30.802,38.515 v1(31.227,38.09) ; v1(48.912,8.958) 50.189,10.235 53.633,10.235 54.284,10.887 v1@54.284,12.061 ; v1(54.239,12.107) v1@54.284,12.061 ; v1(56.778,9.278) 56.778,10.103 54.82,12.061 v1@54.284,12.061 ; v1(60.731,16.228) 58.451,16.228 v1@54.284,12.061
  Layer 2 w0.5: v1@54.284,12.061 54.284,23.182 56.508,25.405 v1(56.508,25.685)
  Layer 3 w0.5: v1(55.466,38.015) 55.466,37.322 55.933,36.854 55.933,29.018 56.508,28.444 v1(56.508,25.685) ; 55.933,35.82 56.925,36.811 56.925,39.909 v1(57.653,40.637)
  Layer 3 w1: v1(31.227,38.09) 33.047,36.27 39.536,36.27 40.624,35.182 v1(40.624,35.169) 40.624,28.659 43.741,25.542 43.741,22.851 44.688,21.904 54.156,21.904 56.508,24.256 v1(56.508,25.685)
  Bottom Layer w0.25: U1.38@54.558,28.625 54.558,28.102 55.221,27.439 C137.2@55.221,26.696 ; v1(55.466,38.015) 55.466,37.948 55.549,37.864 55.549,37.434 U1.13@55.558,37.425
  Bottom Layer w0.5: C137.2@55.251,26.726 55.26,26.735 55.268,26.726 55.646,26.726 56.508,25.865 v1(56.508,25.685) ; 57.653,40.018 v1(57.653,40.637)
1V25@0A5: C73.2 C74.2 C76.2 C79.2 C80.2 C81.2 C88.2 C89.2 C132.2 C133.2 C134.2 C138.2 C139.2 FB32.2 U1.15 U1.19 U1.30 U1.34 U1.57 | length 49.4
  TopLayer w0.25: C132.2@57.593,38.66 58.552,38.66 58.716,38.497 v2@58.822,38.497 ; v2(58.803,38.477) 59.492,39.165 C133.2@60.25,39.165 ; 58.928,29.915 58.928,29.876 59.225,29.579 v2(59.225,29.425) ; 58.928,31.89 58.963,31.925 C89.2@60.25,31.925
  TopLayer w0.5: C80.2@46.67,31.34 48.48,31.34 51.046,28.775 55.544,28.775 56.767,27.552 v2@57.967,27.552 ; v2(57.956,27.563) v2@57.967,27.552 ; C73.2@58.778,27.541 57.978,27.541 v2@57.967,27.552 ; v2(58.803,38.477) 58.6,38.273 58.6,37.032 59.582,36.05 v2(61,36.05) ; C73.2@58.928,27.541 58.928,28.787 58.928,29.876 ; 58.928,29.915 58.928,31.89 58.928,33.232 ; 59.575,36.05 58.928,35.403 58.928,34.65 ; C79.2@60.25,33.2 58.96,33.2 58.928,33.232 ; C74.2@60.25,34.65 58.928,34.65 ; 58.928,33.232 58.928,34.65
  Bottom Layer w0.25: v2(44.227,32.877) 45.648,32.877 46.046,33.275 U1.57@48.908,33.275 ; U1.15@56.558,37.425 56.558,37.794 57.241,38.477 v2(58.803,38.477) ; U1.30@57.708,30.275 58.258,30.275 58.408,30.125 58.525,30.125 v2(59.225,29.425) ; U1.19@57.708,35.775 60.125,35.775 60.4,36.05 v2(61,36.05)
  Bottom Layer w0.3: U1.34@56.558,28.625 56.558,28.338 57.333,27.563 v2(57.956,27.563)
  other v1: 20.497,29.937 20.497,30.543 20.497,31.15
1V25@1A: C72.2 C113.2 C114.2 C115.2 C116.2 C117.2 C118.2 C119.2 C120.2 C121.2 FB31.2 U1.1 U1.2 U1.47 U1.48 U1.49 U1.52 U1.55 U1.61 U1.64 | length 33
  TopLayer w0.25: 47.452,32.427 48.346,32.427 48.488,32.285 48.548,32.345 48.608,32.285 C121.2@48.608,32.275
  TopLayer w0.5: FB31.2@22.275,43.811 22.325,43.811 22.855,44.341 v1(23.306,44.341) 23.584,44.064 23.584,43.461 23.609,43.436 C72.2@23.659,43.436
  Layer 3 w1: v1(23.306,44.341) 23.362,44.341 23.905,43.798 27.559,43.798 28.071,43.286 42.533,43.286 44.725,41.094
  Bottom Layer w0.25: v1(46.367,32.182) 46.45,32.265 48.899,32.265 U1.55@48.908,32.275 ; C117.2@47.377,28.133 C117.2@47.381,28.13 ; C114.2@47.698,38.952 47.7,38.95 48.452,38.95 C115.2@48.454,38.948 ; U1.2@50.058,37.425 U1.2@50.058,37.575
  Bottom Layer w0.3: C116.2@47.237,35.432 47.237,35.442 47.344,35.442 47.351,35.449 v2(47.834,35.449) ; 47.425,30.45 v2(47.834,30.45) 48.158,30.775 U1.52@48.908,30.775 ; v2@48.039,35.421 48.135,35.325 48.708,35.325 48.758,35.275 U1.61@48.908,35.275
  other v2: 49.291,27.646 48.294,28.369 49.011,37.838